# Altium PCB Zybo_Z7_Pcb.PcbDoc (part 7 of 8)
Units mm, origin at the board's own origin, x right, y up, seen from the top; angles counter-clockwise.
Board outline 122 x 88 mm, 8 copper layers (Top Layer, Layer 2, Layer 3, Layer 4, Layer 5, Layer 6, Layer 7, Bottom Layer), stack 1.625 mm thick; 658 components, 558 nets, 2538 pads, 924 vias.
Unrouted connection lines stored in the file: 1229.
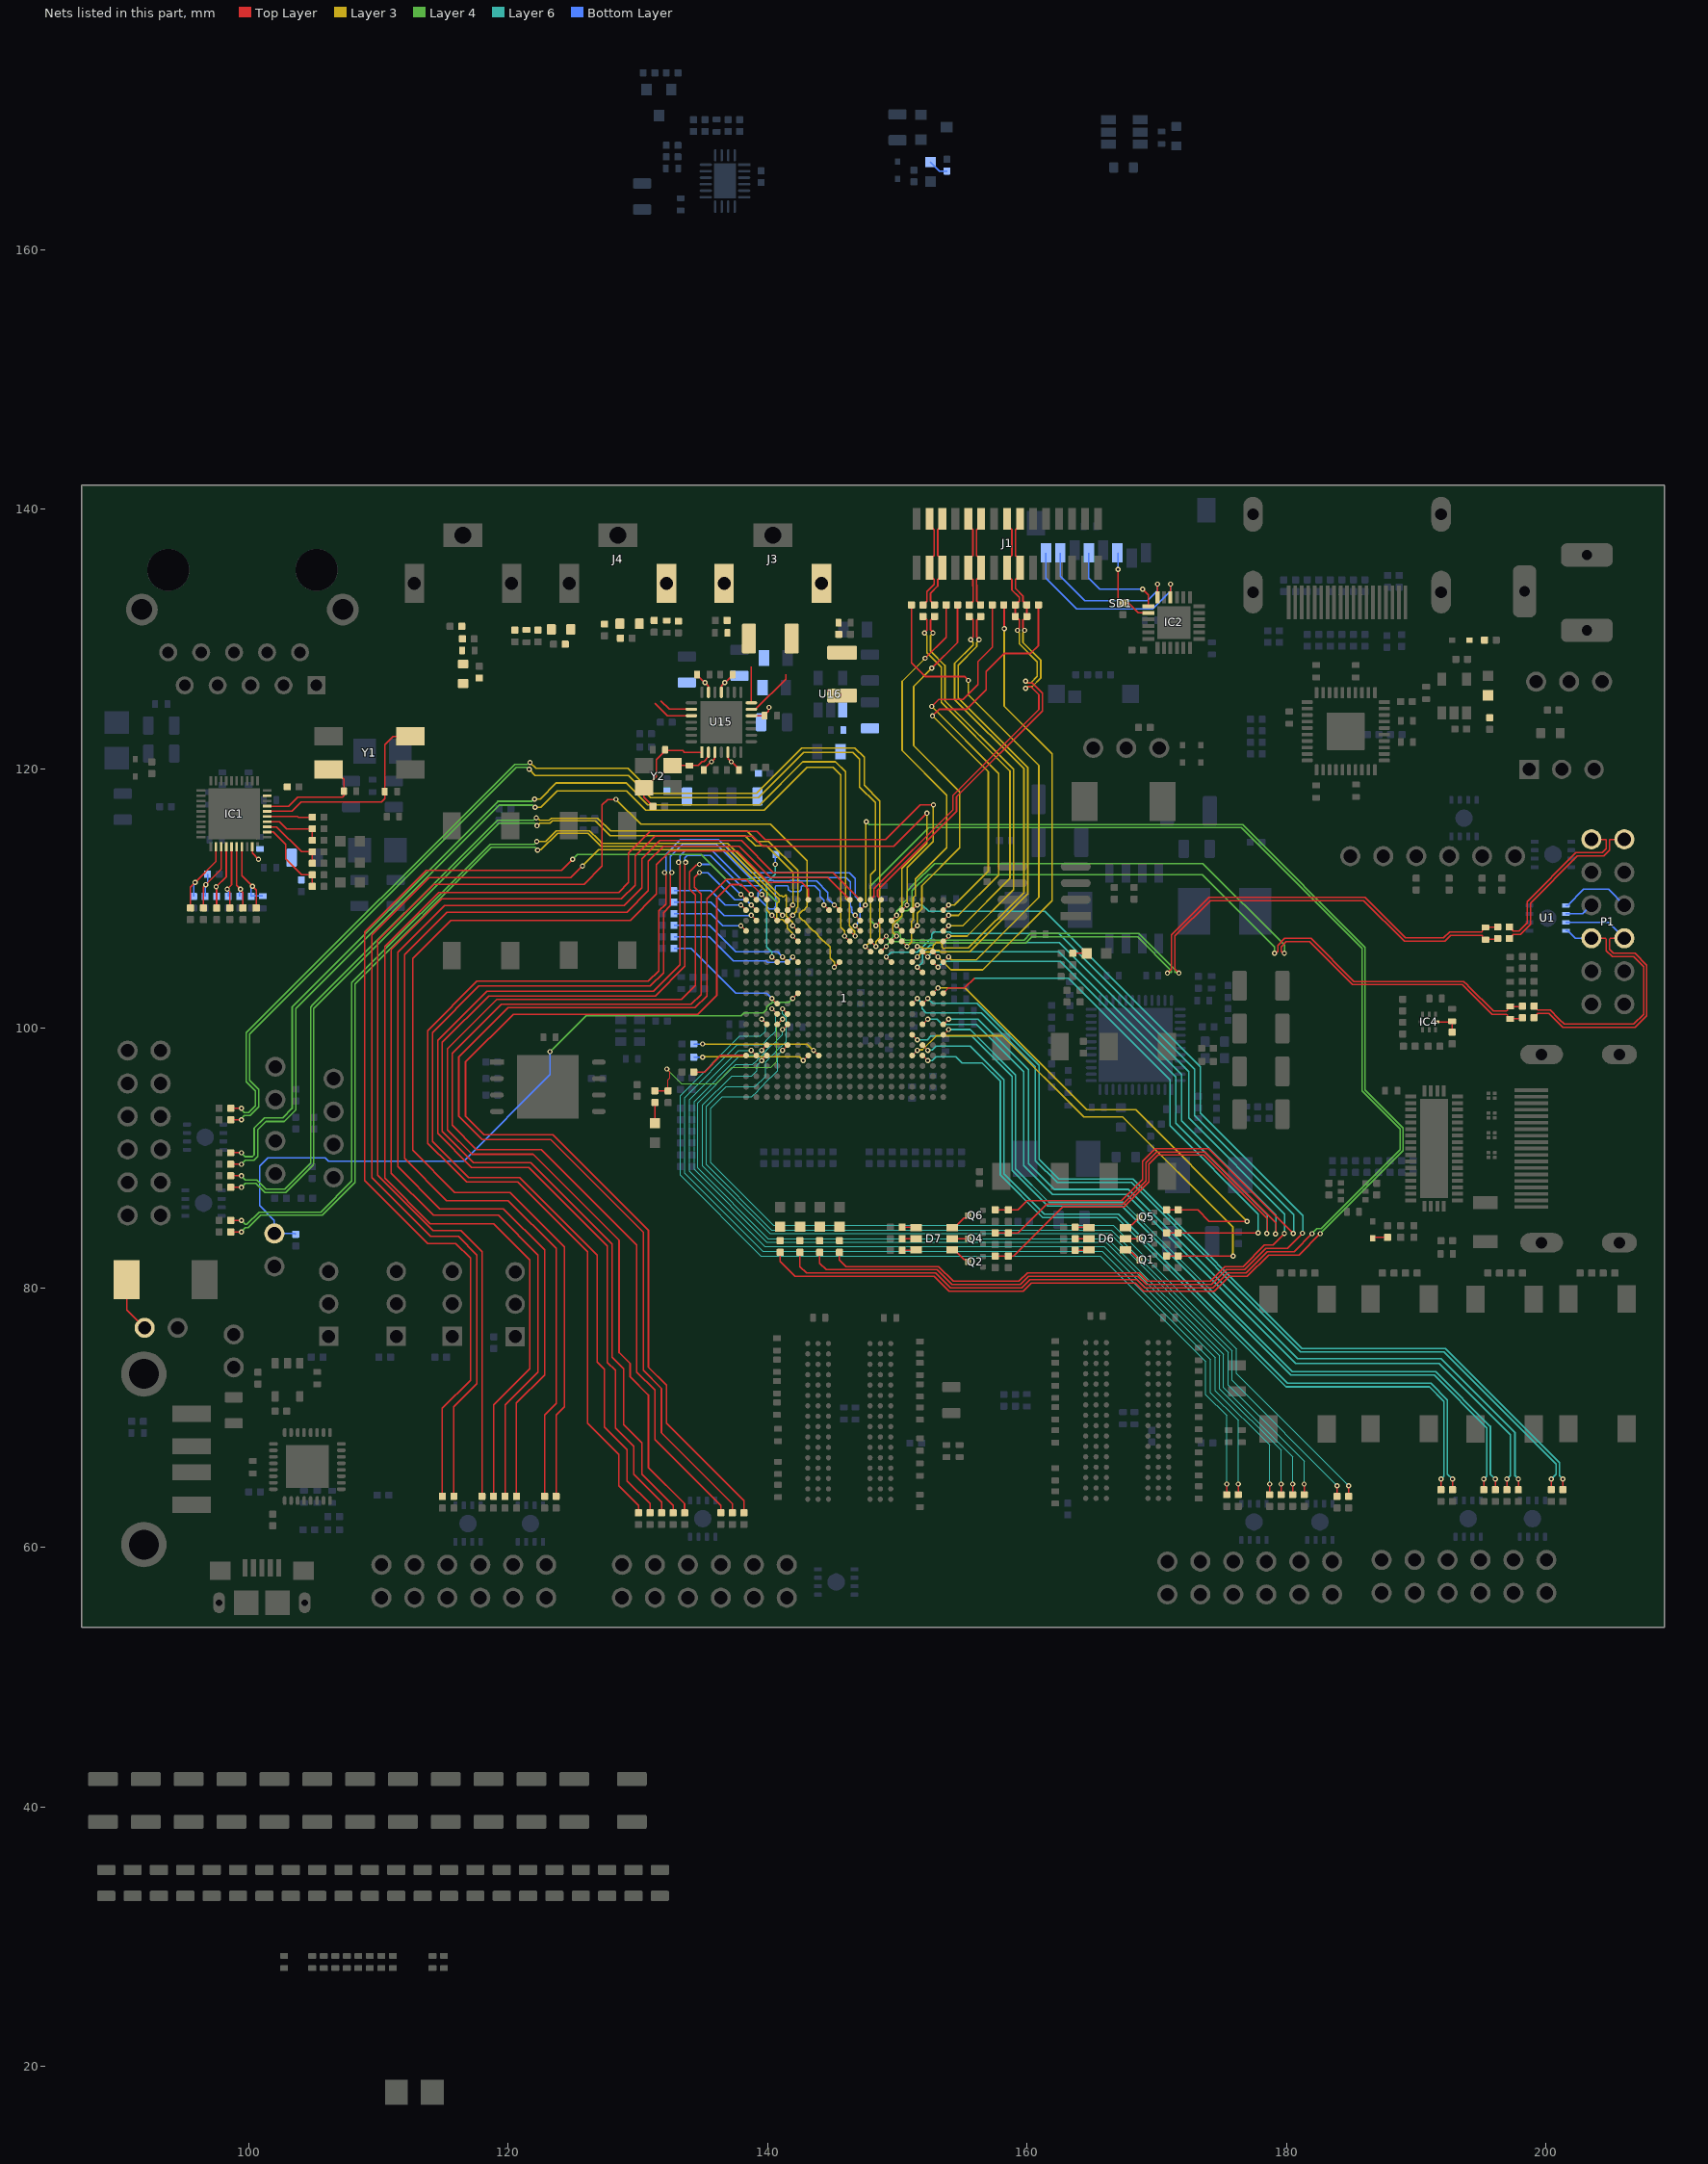
[diagram p12: the nets of this part, all layers, seen from the top]

## Via types
v1: diameter 0.4, hole 0.2, Top Layer to Bottom Layer, 249 vias
v2: diameter 0.4/0.2/0.2/0.2/0.2/0.2/0.2/0.2 (per signal layer), hole 0.2, Top Layer to Bottom Layer, 148 vias
v3: diameter 0.4/0.2/0.4/0.2/0.2/0.2/0.2/0.2 (per signal layer), hole 0.2, Top Layer to Bottom Layer, 136 vias
v4: diameter 0.4/0.2/0.2/0.4/0.2/0.2/0.2/0.2 (per signal layer), hole 0.2, Top Layer to Bottom Layer, 98 vias
v5: diameter 0.4/0.2/0.2/0.2/0.2/0.4/0.2/0.2 (per signal layer), hole 0.2, Top Layer to Bottom Layer, 68 vias
v6: diameter 0.4/0.4/0.2/0.2/0.4/0.2/0.4/0.4 (per signal layer), hole 0.2, Top Layer to Bottom Layer, 62 vias
v7: diameter 0.5, hole 0.2, Top Layer to Bottom Layer, 52 vias
v8: diameter 0.4/0.2/0.2/0.2/0.2/0.2/0.2/0.4 (per signal layer), hole 0.2, Top Layer to Bottom Layer, 31 vias
v9: diameter 0.5, hole 0.3, Top Layer to Bottom Layer, 25 vias
v10: diameter 0.4/0.4/0.2/0.2/0.4/0.4/0.4/0.4 (per signal layer), hole 0.2, Top Layer to Bottom Layer, 20 vias
v11: diameter 0.2/0.2/0.2/0.4/0.2/0.2/0.2/0.4 (per signal layer), hole 0.2, Top Layer to Bottom Layer, 15 vias
v12: diameter 0.2/0.2/0.2/0.2/0.2/0.4/0.2/0.4 (per signal layer), hole 0.2, Top Layer to Bottom Layer, 11 vias
v13: diameter 0.4/0.4/0.4/0.4/0.4/0.4/0.4/0.4 (per signal layer), hole 0.2, Top Layer to Bottom Layer, 5 vias
v14: diameter 0.4/0.2/0.2/0.2/0.2/0.4/0.2/0.4 (per signal layer), hole 0.2, Top Layer to Bottom Layer, 2 vias
v15: diameter 0.2/0.4/0.4/0.4/0.4/0.4/0.4/0.4 (per signal layer), hole 0.2, Top Layer to Bottom Layer, 2 vias

## Nets (pads, with @x,y where several pads share a name; then routed paths per layer and width w, separated by ;. In a path a pad name is that pad's centre, name@x,y a point inside that pad or via, vN(x,y) a via of type N, cw(c..) or ccw(c..) an arc to the next point about the centre after c; other vN are vias at no path point) (continued)
JA3_N: P1.7 R263.1 U1.1 | length 19
  Top Layer w0.1: R263.1@197.173,106.934 197.386,107.147 197.386,107.183 197.457,107.254 198.031,107.254 198.805,108.027 198.805,109.678 202.415,113.288 204.447,113.288 204.89,113.731 204.89,114.513 204.948,114.571 P1.7@206.035,114.571
  Bottom Layer w0.1: U1.1@201.524,109.479 201.669,109.479 202.909,110.719 204.808,110.719 206.035,109.491
JA3_P: P1.1 R265.1 U1.2 | length 15.3
  Top Layer w0.1: R265.1@197.173,107.823 197.386,107.61 197.386,107.574 197.457,107.504 197.928,107.504 198.555,108.131 198.555,109.782 202.311,113.538 204.343,113.538 204.64,113.835 204.64,114.513 204.581,114.571 P1.1@203.495,114.571
  Bottom Layer w0.1: U1.2@201.524,108.829 202.832,108.829 203.495,109.491
JA3_R_N: 1.P16 C84.2 R263.2 | length 56.4
  Top Layer w0.05: 1.P16@148.742,106.718 v4(149.142,107.118)
  Top Layer w0.1: v1(171.704,104.267) 171.384,104.587 171.384,107.122 174.121,109.859 185.951,109.859 189.077,106.734 192.205,106.734 192.661,107.19 195.055,107.19 195.113,107.131 195.113,107.015 195.288,106.84 C84.2@195.326,106.84 195.354,106.868 196.207,106.868 R263.2@196.273,106.934
  Layer 4 w0.1: v4(149.142,107.118) 149.142,107.045 149.344,106.843 149.427,106.843 149.539,106.955 149.583,106.955 149.642,107.014 149.642,107.242 149.818,107.418 150.066,107.418 150.242,107.242 150.242,106.989 150.301,106.93 150.506,106.93 150.618,106.818 152.466,106.818 153.818,106.818 159.779,106.818 160.272,107.311 168.62,107.311 171.384,104.546 171.384,104.36 171.443,104.301 171.67,104.301 v1(171.704,104.267)
JA3_R_P: 1.P15 C84.1 R265.2 | length 55.7
  Top Layer w0.05: 1.P15@148.742,105.918 v4(149.142,106.318)
  Top Layer w0.1: v1(170.815,104.267) 171.134,104.586 171.134,107.226 174.017,110.109 186.055,110.109 189.18,106.984 192.101,106.984 192.557,107.44 195.055,107.44 195.113,107.499 195.113,107.615 195.288,107.79 C84.1@195.326,107.79 196.24,107.79 R265.2@196.273,107.823
  Layer 4 w0.1: v4(149.142,106.318) 149.142,106.391 149.344,106.593 149.531,106.593 149.643,106.705 150.172,106.705 150.197,106.68 150.402,106.68 150.464,106.618 151.666,106.618 151.716,106.568 152.57,106.568 152.968,106.568 153.018,106.618 153.266,106.618 153.316,106.568 153.714,106.568 159.882,106.568 160.375,107.061 168.516,107.061 171.134,104.442 171.134,104.36 171.076,104.301 170.849,104.301 v1(170.815,104.267)
JA4_N: P1.10 R264.1 U1.3 | length 23.9
  Top Layer w0.1: R264.1@199.078,100.838 199.291,101.051 199.291,101.087 199.362,101.158 200.214,101.158 201.291,100.08 201.672,100.08 206.86,100.08 207.768,100.988 207.768,104.879 206.856,105.791 205.205,105.791 204.89,106.106 204.89,106.893 204.948,106.951 P1.10@206.035,106.951
  Bottom Layer w0.1: U1.3@201.524,108.179 204.808,108.179 P1.10@206.035,106.951
JA4_P: P1.4 R266.1 U1.4 | length 20.7
  Top Layer w0.1: R266.1@199.078,101.727 199.291,101.514 199.291,101.478 199.362,101.408 200.317,101.408 200.964,100.761 201.052,100.672 201.395,100.33 206.756,100.33 207.518,101.092 207.518,104.775 206.752,105.541 205.101,105.541 204.64,106.002 204.64,106.893 204.581,106.951 P1.4@203.495,106.951
  Bottom Layer w0.1: U1.4@201.524,107.529 201.669,107.529 202.246,106.951 P1.4@203.495,106.951
JA4_R_N: 1.R18 C85.2 R264.2 | length 58
  Top Layer w0.05: 1.R18@149.542,108.318 v4(149.942,108.718)
  Top Layer w0.1: v1(179.832,105.791) 179.751,105.791 179.576,105.966 179.576,106.299 179.961,106.684 181.779,106.684 185.085,103.378 193.55,103.378 195.834,101.094 196.96,101.094 197.018,101.035 197.018,100.919 197.193,100.744 C85.2@197.231,100.744 197.259,100.772 198.112,100.772 R264.2@198.178,100.838
  Layer 4 w0.1: v4@149.935,108.718 149.935,109.041 150.435,109.541 150.435,109.642 150.749,109.956 150.749,110.59 151.257,111.097 152.859,112.7 173.558,112.7 179.832,106.426 v1(179.832,105.791)
JA4_R_P: 1.T17 C85.1 R266.2 | length 57.6
  Top Layer w0.05: v4(149.942,107.918) 1.T17@150.342,107.518
  Top Layer w0.1: v1(179.07,105.791) 179.151,105.791 179.326,105.966 179.326,106.403 179.857,106.934 181.883,106.934 185.189,103.628 193.654,103.628 193.942,103.339 194.031,103.251 195.938,101.344 196.96,101.344 197.018,101.403 197.018,101.519 197.193,101.694 C85.1@197.231,101.694 198.145,101.694 R266.2@198.178,101.727
  Layer 4 w0.1: v4@149.942,107.911 149.966,107.935 149.966,108.183 150.335,108.552 150.335,108.933 150.463,109.061 150.812,109.061 151.13,109.379 151.13,110.617 152.375,111.862 173.507,111.862 179.07,106.299 v1(179.07,105.791)
JB1_N: 1.V8 R3.1 | length 67.3
  Top Layer w0.05: 1.V8@151.942,100.318 v5(152.342,100.718)
  Top Layer w0.1: R3.1@196.977,64.458 v1(196.977,65.278)
  Layer 6 w0.1: v5@152.335,100.718 153.059,100.718 153.447,100.33 153.758,100.33 153.77,100.318 156.095,100.318 159.742,96.671 159.742,89.432 161.949,87.225 167.664,87.225 180.703,74.186 191.752,74.186 197.242,68.696 197.242,65.543 v1(196.977,65.278)
JB1_P: 1.Y8 R4.2 | length 66.2
  Top Layer w0.05: 1.Y8@153.542,100.318 v5(153.942,100.718)
  Top Layer w0.1: R4.2@197.866,64.458 v1(197.866,65.278)
  Layer 6 w0.131: v5@153.935,100.718 156.218,100.718 160.111,96.824 160.111,89.585 162.102,87.594 167.817,87.594 180.856,74.556 191.905,74.556 197.612,68.849 197.612,65.532 v1(197.866,65.278)
JB2_N: 1.U7 R5.1 | length 66.2
  Top Layer w0.05: 1.U7@151.142,99.518 v5(151.542,99.118)
  Top Layer w0.1: R5.1@195.199,64.458 v1(195.199,65.278)
  Layer 6 w0.1: v5@151.542,99.125 152.3,99.125 152.59,99.414 153.014,99.414 153.018,99.418 153.266,99.418 153.27,99.414 155.729,99.414 158.844,96.299 158.844,89.06 161.577,86.327 167.292,86.327 180.331,73.288 191.38,73.288 195.438,69.23 195.438,65.517 v1(195.199,65.278)
JB2_P: 1.V5 R7.1 | length 62.6
  Top Layer w0.05: 1.V5@151.942,97.918 v5(152.342,97.518)
  Top Layer w0.1: R7.1@191.897,64.458 v1(191.897,65.278)
  Layer 6 w0.1: v5(152.342,97.518) 152.695,97.518 152.995,97.818 154.525,97.818 154.997,97.345 156.527,97.345
  Layer 6 w0.131: 156.527,97.345 157.946,95.927 157.946,88.688 161.205,85.429 166.92,85.429 179.959,72.39 191.008,72.39 192.136,71.262 192.136,65.517 v1(191.897,65.278)
JB3_N: 1.Y7 R6.2 | length 64.3
  Top Layer w0.05: 1.Y7@153.542,99.518 v5(153.942,99.918)
  Top Layer w0.1: R6.2@196.088,64.458 v1(196.088,65.278)
  Layer 6 w0.131: v5@153.935,99.918 155.606,99.918 159.113,96.411 159.113,89.172 161.689,86.596 167.404,86.596 180.443,73.557 191.492,73.557 195.707,69.342 195.707,65.659 v1(196.088,65.278)
JB3_P: 1.U10 R1.1 | length 71.3
  Top Layer w0.05: 1.U10@151.142,101.918 v5(151.542,102.318)
  Top Layer w0.1: R1.1@200.406,64.458 v1(200.406,65.278)
  Layer 6 w0.1: v5@151.535,102.318 151.907,101.946 151.907,101.533 152.223,101.217 156.466,101.217 160.64,97.043 160.64,89.804 162.321,88.123 168.036,88.123 181.075,75.084 192.124,75.084 200.772,66.436 200.772,65.644 v1(200.406,65.278)
JB4_N: 1.V6 R8.2 | length 63.4
  Top Layer w0.05: 1.V6@151.942,98.718 v5(152.342,98.318)
  Top Layer w0.1: R8.2@192.786,64.458 v1(192.786,65.278)
  Layer 6 w0.1: v5@152.342,98.325 152.696,98.325 152.993,98.622 155.632,98.622 158.215,96.039 158.215,88.8 161.317,85.698 167.032,85.698 180.071,72.659 191.12,72.659 192.405,71.374 192.405,65.659 v1(192.786,65.278)
JB4_P: 1.V10 R2.2 | length 70.5
  Top Layer w0.05: 1.V10@151.942,101.918 v5(152.342,102.318)
  Top Layer w0.1: R2.2@201.295,64.458 v1(201.295,65.278)
  Layer 6 w0.1: v5@152.335,102.318 152.723,101.93 156.134,101.93 160.909,97.155 160.909,89.916 162.433,88.392 168.148,88.392 181.187,75.353 192.236,75.353 201.041,66.548 201.041,65.532 v1(201.295,65.278)
JC1_N: 1.J19 R17.1 | length 93.2
  Top Layer w0.05: v2(144.342,109.518) 1.J19@144.742,109.118
  Top Layer w0.1: R17.1@132.715,62.68 132.715,63.246 130.302,65.659 130.302,68.072 128.905,69.469 128.905,73.787 128.016,74.676 128.016,83.375 121.729,89.662 117.341,89.662 114.934,92.069 114.934,98.939 118.511,102.516 131.338,102.516 133.604,104.782 133.604,112.725 v1(133.68,112.801)
  Bottom Layer w0.1: v1(133.68,112.801) 133.608,112.874 133.608,113.135 133.803,113.33 135.59,113.33 137.922,110.998 139.522,110.998 139.581,110.939 139.581,110.781 139.242,110.442 139.242,110.079 140.103,109.218 140.466,109.218 140.642,109.394 140.642,110.136 140.581,110.197 140.581,110.939 140.64,110.998 141.554,110.998 141.613,110.939 141.613,110.69 141.763,110.54 142.463,110.54 142.613,110.69 142.613,110.939 142.672,110.998 143.637,110.998 144.035,110.6 144.035,110.194 144.342,109.887 v2@144.342,109.511
JC1_P: 1.K19 R18.2 | length 90.3
  Top Layer w0.05: v2(145.142,109.518) 1.K19@145.542,109.118
  Top Layer w0.1: R18.2@131.826,62.68 131.826,63.5 129.667,65.659 129.667,67.818 128.27,69.215 128.27,73.66 127.662,74.268 127.662,83.228 121.582,89.308 117.194,89.308 114.58,91.922 114.58,99.086 118.364,102.87 131.191,102.87 133.25,104.929 133.25,112.698 v1(133.147,112.801)
  Bottom Layer w0.1: v1(133.147,112.801) 133.248,112.903 133.248,113.284 133.654,113.69 135.738,113.69 138.071,111.357 139.698,111.357 139.731,111.39 140.431,111.39 140.464,111.357 141.73,111.357 141.763,111.39 142.463,111.39 142.496,111.357 143.786,111.357 144.653,110.49 144.653,110 v2@145.142,109.511
JC2_N: 1.B20 R9.1 | length 79.7
  Top Layer w0.05: v2(138.742,110.318) 1.B20@139.142,109.918
  Top Layer w0.131: R9.1@138.176,62.68 138.176,63.627 132.207,69.596 132.207,72.517 130.81,73.914 130.81,84.455 123.444,91.821 118.148,91.821 116.713,93.256 116.713,97.409 120.396,101.092 134.62,101.092 136.079,102.551 136.079,110.044 137.128,111.093 137.96,111.093 v2@138.739,110.315
JC2_P: 1.C20 R10.2 | length 81.4
  Top Layer w0.05: v2(139.542,110.318) 1.C20@139.942,109.918
  Top Layer w0.131: R10.2@137.287,62.68 137.287,63.373 131.822,68.838 131.822,72.267 130.425,73.664 130.425,84.296 123.285,91.436 117.989,91.436 116.205,93.22 116.205,97.811 119.994,101.6 134.41,101.6 135.321,102.511 135.321,110.004 136.795,111.478 138.375,111.478 v2@139.539,110.315
JC3_N: 1.M18 R21.1 | length 94
  Top Layer w0.05: v2(146.742,108.718) 1.M18@147.142,108.318
  Top Layer w0.1: R21.1@130.937,62.68 130.937,63.373 129.159,65.151 129.159,67.564 127.436,69.287 127.436,73.732 126.873,74.295 126.873,82.55 120.904,88.519 116.944,88.519 114.157,91.306 114.157,99.686 117.749,103.278 130.957,103.278 131.977,104.298 131.977,108.921 132.512,109.456 132.512,111.912 v1(132.613,112.014)
  Bottom Layer w0.1: v1(132.613,112.014) 132.51,112.117 132.51,113.264 133.442,114.196 136.07,114.196 138.633,111.633 146.05,111.633 146.395,111.288 146.395,109.435 146.494,109.335 146.494,108.959 v2@146.742,108.711
JC3_P: 1.M17 R22.2 | length 96
  Top Layer w0.05: v2(146.742,107.918) 1.M17@147.142,107.518
  Top Layer w0.1: R22.2@130.048,62.68 130.048,63.246 128.524,64.77 128.524,67.183 126.111,69.596 126.111,82.811 120.757,88.165 116.797,88.165 115.578,89.384 113.803,91.159 113.803,99.833 117.602,103.632 130.81,103.632 131.623,104.445 131.623,109.068 132.158,109.603 132.158,111.911 v1(132.055,112.014)
  Bottom Layer w0.1: v1(132.055,112.014) 132.156,112.116 132.156,113.411 133.295,114.55 135.862,114.55 136.217,114.55 138.779,111.987 146.304,111.987 146.749,111.542 146.749,110.172 147.142,109.779 147.142,108.311 v2@146.742,107.911
JC4_N: 1.A20 R14.2 | length 81.9
  Top Layer w0.05: v2(137.942,110.318) 1.A20@138.342,109.918
  Top Layer w0.131: R14.2@133.604,62.68 133.604,63.373 130.81,66.167 130.81,71.755 129.413,73.152 129.413,74.168 128.559,75.022 128.559,83.669 121.919,90.308 117.217,90.308 115.327,92.198 115.327,98.436 119.126,102.235 133.35,102.235 134.427,103.312 134.427,110.302 133.99,110.739 133.99,112.08 134.508,112.598 134.696,112.598 v1(134.747,112.649)
  Bottom Layer w0.131: v1(134.747,112.649) 135.611,112.649 137.935,110.325 v2@137.935,110.318
JC4_P: 1.B19 R13.1 | length 83.3
  Top Layer w0.05: v2(138.742,109.518) 1.B19@139.142,109.118
  Top Layer w0.1: v1(134.747,112.014) 134.36,111.627 134.36,110.892 134.874,110.378 134.874,102.616 134.111,101.853 119.477,101.853 115.697,98.072 115.697,92.55 117.569,90.678 122.555,90.678 129.921,83.312 129.921,73.533 131.318,72.136 131.318,68.326 136.398,63.246 R13.1@136.398,62.68
  Bottom Layer w0.1: v1(134.747,112.014) 135.382,112.014 137.485,109.911 138.342,109.911 v2@138.742,109.511
JD1_N: 1.E19 R16.2 | length 67.6
  Top Layer w0.05: 1.E19@141.542,109.118 v3(141.942,109.518)
  Top Layer w0.1: R16.2@98.621,87.757 v1(99.441,87.757)
  Layer 4 w0.1: v1(99.441,87.757) 99.761,88.077 100.546,88.077 101.246,87.376 102.87,87.376 104.956,89.462 105.029,89.535 105.029,101.551 119.278,115.801 120.593,115.801 122.027,115.801 122.207,115.621 v1(122.235,115.621)
  Layer 3 w0.1: v1(122.235,115.621) 122.442,115.827 123.24,115.827 123.42,116.007 126.715,116.007 127.862,114.86 138.258,114.86 139.054,114.065 139.935,114.065 141.981,112.019 141.981,109.564 v3@141.935,109.518
JD1_P: 1.E18 R15.1 | length 69
  Top Layer w0.05: 1.E18@141.542,108.318 v3(141.942,108.718)
  Top Layer w0.1: R15.1@98.621,88.646 v1(99.441,88.646)
  Layer 4 w0.1: v1(99.441,88.646) 99.76,88.327 100.649,88.327 100.723,88.253 101.35,87.626 102.766,87.626 104.779,89.639 104.779,101.655 104.946,101.822 119.175,116.051 120.49,116.051 121.965,116.051 122.145,116.23 v1(122.174,116.23)
  Layer 3 w0.1: v1(122.174,116.23) 122.255,116.23 122.458,116.027 123.157,116.027 123.337,116.207 126.896,116.207 127.889,115.214 138.405,115.214 139.2,114.419 140.082,114.419 142.335,112.165 142.335,109.352 142.24,109.257 142.24,109.023 v3@141.935,108.718
JD2_N: 1.F17 R11.1 | length 69.8
  Top Layer w0.05: v3(141.942,107.918) 1.F17@142.342,107.518
  Top Layer w0.1: R11.1@98.621,85.217 v1(99.441,85.217)
  Layer 4 w0.1: v1(99.441,85.217) 99.761,84.897 99.862,84.897 100.817,85.852 105.564,85.852 107.954,88.242 107.954,103.534 118.616,114.196 122.004,114.196 v1(122.211,114.402) v1(122.211,114.402)
  Layer 3 w0.1: v1(122.211,114.402) 122.885,114.402 123.723,115.24 126.289,115.24 126.96,114.568 127.252,114.277 136.919,114.277 140.98,110.216 141.063,110.216 141.098,110.251 141.098,110.202 141.156,110.144 141.239,110.144 141.393,110.297 141.451,110.297 141.451,110.002 141.442,109.993 141.442,108.646 141.77,108.318 141.774,108.318 141.93,108.162 v3@141.93,107.949
JD2_P: 1.F16 R12.2 | length 70.4
  Top Layer w0.05: v3(141.942,107.118) 1.F16@142.342,106.718
  Top Layer w0.1: R12.2@98.621,84.328 v1(99.441,84.328)
  Layer 4 w0.1: v1(99.441,84.328) 99.761,84.647 99.966,84.647 100.921,85.602 105.668,85.602 105.741,85.675 108.204,88.138 108.204,103.431 118.72,113.946 122.069,113.946 122.274,113.741 v1(122.276,113.741)
  Layer 3 w0.1: v1(122.276,113.741) 122.307,113.773 122.539,113.773 123.806,115.04 126.143,115.04 127.151,114.032 127.156,114.027 136.816,114.027 140.873,109.969 140.873,109.778 140.709,109.613 140.709,108.547 140.854,108.402 141.153,108.402 141.53,108.025 141.53,107.741 141.945,107.326 v3@141.945,107.111
JD3_N: 1.L17 R19.1 | length 81.1
  Top Layer w0.05: 1.L17@146.342,107.518 v3(146.742,107.118)
  Top Layer w0.1: R19.1@98.621,90.424 v1(99.441,90.424)
  Layer 4 w0.131: v1(99.441,90.424) 99.745,90.12 100.28,90.12 100.43,90.27 100.43,92.318 101.23,93.118 102.627,93.118 103.351,93.842 103.351,101.64 119.212,117.501 121.825,117.501 122.002,117.678 v1(122.036,117.678)
  Layer 3 w0.131: v1(122.036,117.678) 122.479,117.678 123.723,118.923 129.078,118.923 130.767,117.234 139.408,117.234 142.723,120.548 145.237,120.548 146.011,119.775 146.011,110.021 146.304,109.728 146.304,107.903 146.691,107.517 146.691,107.176 v3@146.742,107.125
JD3_P: 1.L16 R20.2 | length 80.2
  Top Layer w0.05: v3(145.942,107.118) 1.L16@146.342,106.718
  Top Layer w0.1: R20.2@98.621,89.535 v1(99.441,89.535)
  Layer 4 w0.131: v1(99.441,89.535) 99.745,89.839 100.396,89.839 100.711,90.154 100.711,92.202 101.346,92.837 102.743,92.837 103.632,93.726 103.632,101.524 119.328,117.22 121.861,117.22 122.038,117.043 v1(122.072,117.043)
  Layer 3 w0.1: v1(122.072,117.043) 122.53,117.043 123.774,118.288 129.132,118.288 130.597,116.823 139.727,116.823 143.041,120.137 145.039,120.137 145.641,119.535 145.641,107.801 145.942,107.5 v3@145.942,107.111
JD4_N: 1.N16 R23.1 | length 82.9
  Top Layer w0.05: 1.N16@147.942,106.718 v3(148.342,106.318)
  Top Layer w0.1: R23.1@98.621,93.853 v1(99.441,93.853)
  Layer 4 w0.1: v1(99.441,93.853) 99.441,93.772 99.679,93.533 100.01,93.533 100.534,94.057 100.534,95.2 99.826,95.908 99.826,99.672 120.51,120.356 121.478,120.356 121.619,120.498 v1(121.686,120.498)
  Layer 3 w0.1: v1(121.686,120.498) 122.144,120.04 129.235,120.04 131.14,118.135 139.157,118.135 142.637,121.615 146.71,121.615 147.441,120.885 147.441,118.751 148.649,117.543 148.649,107.003 148.339,106.693 v3@148.339,106.325
JD4_P: 1.N15 R24.2 | length 82.5
  Top Layer w0.05: v3(147.542,106.318) 1.N15@147.942,105.918
  Top Layer w0.1: R24.2@98.621,92.964 v1(99.441,92.964)
  Layer 4 w0.1: v1(99.441,92.964) 99.441,93.045 99.679,93.283 100.114,93.283 100.784,93.954 100.784,95.304 100.711,95.377 100.076,96.012 100.076,99.568 120.614,120.106 121.412,120.106 121.554,119.964 v1(121.621,119.964)
  Layer 3 w0.1: v1(121.621,119.964) 122.078,119.507 129.268,119.507 130.994,117.781 139.304,117.781 142.784,121.261 146.564,121.261 147.087,120.738 147.087,118.604 148.295,117.397 148.295,112.227 147.935,111.867 147.935,108.084 147.942,108.077 147.942,107.746 147.935,107.739 147.935,106.701 v3@147.545,106.311
JE1: 1.D19 R38.2 | length 86.5
  Top Layer w0.05: 1.D19@140.742,109.118 v4(141.142,108.718)
  Top Layer w0.1: R38.2@114.935,63.95 114.935,70.739 117.094,72.898 117.094,82.296 115.954,83.436 113.795,83.436 108.961,88.27 108.961,107.437 113.696,112.172 124.11,112.172 v1(124.968,113.03)
  Layer 4 w0.1: v1(124.968,113.03) 125.349,113.411 134.874,113.411 136.779,111.506 138.938,111.506 140.716,109.728 140.716,109.151 v4@141.142,108.725
JE2: 1.G20 R26.2 | length 86.3
  Top Layer w0.1: R26.2@123.698,63.95 123.698,70.222 124.333,70.857 124.333,83.185 120.142,87.376 115.892,87.376 112.649,90.619 112.649,105.41 115.57,108.331 129.413,108.331 131.445,110.363 131.445,112.615 132.495,113.665 137.668,113.665 140.081,111.252 142.621,111.252 143.142,110.731 1.G20@143.142,109.918
JE3: 1.T19 R34.2 | length 108.8
  Top Layer w0.05: 1.T19@150.342,109.118 v3(150.742,109.518)
  Top Layer w0.1: R34.2@118.872,63.95 118.872,70.993 121.666,73.787 121.666,82.169 118.872,84.963 114,84.963 110.487,88.476 110.487,106.305 114.675,110.493 128.518,110.493 129.283,111.258 129.283,113.51 130.962,115.189 139.192,115.189 139.827,114.554 149.098,114.554 151.765,117.221 v1(152.781,117.221)
  Layer 3 w0.1: v3@150.735,109.518 150.742,109.525 150.742,112.388 152.775,114.421 152.775,117.215 v1(152.781,117.221)
JE4: 1.R16 R29.1 | length 109.7
  Top Layer w0.05: 1.R16@149.542,106.718 v3(149.942,107.118)
  Top Layer w0.1: R29.1@119.761,63.95 119.761,70.984 122.301,73.524 122.301,82.55 119.253,85.598 114.238,85.598 110.995,88.841 110.995,106.095 114.885,109.985 128.728,109.985 129.791,111.048 129.791,113.3 131.3,114.808 138.855,114.808 139.617,114.046 149.733,114.046 v1(152.273,116.586)
  Layer 3 w0.1: v3@149.935,107.118 149.642,107.411 149.642,108.036 149.921,108.315 149.963,108.315 150.343,108.694 150.343,112.324 152.273,114.254 v1(152.273,116.586)
JE7: 1.D18 R37.1 | length 85.7
  Top Layer w0.05: v2(140.342,108.718) 1.D18@140.742,108.318
  Top Layer w0.1: R37.1@115.824,63.95 115.824,70.866 117.602,72.644 117.602,82.55 116.177,83.975 114.018,83.975 109.5,88.493 109.5,107.214 113.919,111.633 124.841,111.633 v1(125.73,112.522)
  Layer 3 w0.1: v1(125.73,112.522) 126.991,113.783 136.665,113.783 139.954,110.494 139.954,109.099 v2@140.342,108.711
JE8: 1.L20 R25.1 | length 90.5
  Top Layer w0.1: R25.1@122.809,63.95 122.809,70.231 123.698,71.12 123.698,83.058 120.015,86.741 115.257,86.741 112.014,89.984 112.014,105.673 115.307,108.966 129.15,108.966 130.81,110.626 130.81,112.878 131.978,114.046 137.795,114.046 140.208,111.633 144.627,111.633 1.L20@146.342,109.918
JE9: 1.K14 R33.1 | length 100
  Top Layer w0.05: v3(145.142,104.718) 1.K14@145.542,105.118
  Top Layer w0.1: R33.1@117.983,63.95 117.983,82.804 116.363,84.424 114.204,84.424 109.949,88.679 109.949,106.774 114.3,111.125 125.857,111.125 127.254,112.522 127.254,117.221 127.686,117.653 v1(128.321,117.653)
  Layer 3 w0.1: v1(128.321,117.653) 130.226,115.748 140.208,115.748 143.042,112.914 143.042,109.394 142.766,109.118 142.718,109.118 142.442,108.842 142.442,108.594 142.718,108.318 142.766,108.318 143.152,107.933 143.152,107.884 143.537,107.499 143.59,107.499 143.885,107.204 143.885,107.146 144.299,106.732 144.359,106.732 144.812,106.279 144.812,105.419 145.149,105.082 v3@145.149,104.718
JE10: 1.M20 R30.2 | length 92.8
  Top Layer w0.1: R30.2@120.65,63.95 120.65,71.155 122.809,73.314 122.809,82.931 119.634,86.106 114.746,86.106 111.503,89.349 111.503,105.885 115.095,109.477 128.938,109.477 130.299,110.838 130.299,113.089 131.683,114.473 138.003,114.473 140.462,112.014 145.046,112.014 1.M20@147.142,109.918
JF1: 1.E8 R31.1 | length 74.2
  Top Layer w0.05: v5(141.142,99.918) 1.E8@141.542,100.318
  Top Layer w0.1: R31.1@180.467,64.077 v1(180.467,64.897)
  Layer 6 w0.09: v5(141.142,99.918) 141.142,99.535 140.688,99.081 140.688,99.046 140.384,98.743 140.35,98.743 139.902,98.295 139.902,98.261 139.592,97.951 139.557,97.951 139.211,97.604 139.211,97.57 138.864,97.223 137.56,97.223 134.613,94.277 134.613,89.238 140.038,83.813 166.2,83.813 175.126,74.887 175.126,72.347 180.467,67.007 v1(180.467,64.897)
JF2: 1.E9 R27.1 | length 77.6
  Top Layer w0.05: v5(141.142,101.518) 1.E9@141.542,101.118
  Top Layer w0.1: R27.1@183.896,63.95 v1(183.896,64.77)
  Layer 6 w0.09: v5(141.142,101.518) 141.142,101.135 141.437,100.84 141.437,98.996 141.054,98.613 141.02,98.613 140.637,98.23 140.637,98.196 140.359,97.918 140.325,97.918 139.837,97.43 139.837,96.319 139.038,95.521 136.796,95.521 135.277,94.002 135.277,89.513 140.313,84.477 166.475,84.477 175.79,75.162 175.79,72.876 v1(183.896,64.77)
JF3: 1.C6 R36.2 | length 71.8
  Top Layer w0.05: v5(139.542,98.318) 1.C6@139.942,98.718
  Top Layer w0.1: R36.2@179.578,64.077 v1(179.578,64.897)
  Layer 6 w0.09: v5(139.542,98.318) 139.141,97.917 137.873,97.917 134.344,94.388 134.344,89.127 139.927,83.544 166.089,83.544 174.857,74.776 174.857,72.236 179.578,67.515 v1(179.578,64.897)
JF4: 1.D9 R39.1 | length 75.2
  Top Layer w0.05: v5(140.342,101.518) 1.D9@140.742,101.118
  Top Layer w0.1: R39.1@176.276,64.077 v1(176.276,64.897)
  Layer 6 w0.09: v5(140.342,101.518) 140.637,101.223 140.637,99.796 140.359,99.518 140.325,99.518 139.889,99.083 139.889,99.048 139.578,98.737 137.676,98.737 133.625,94.686 133.625,88.829 139.629,82.825 165.791,82.825 174.138,74.478 174.138,71.938 176.276,69.801 v1(176.276,64.897)
JF7: 1.E6 R28.2 | length 74.2
  Top Layer w0.05: v5(141.142,98.318) 1.E6@141.542,98.718
  Top Layer w0.1: R28.2@184.785,63.95 v1(184.785,64.77)
  Layer 6 w0.09: v5(141.142,98.318) 140.793,97.969 140.793,96.751 140.254,96.213 140.22,96.213 139.247,95.24 139.247,95.206 138.783,94.742 136.525,94.742 135.636,93.853 135.636,89.662 140.462,84.836 166.624,84.836 176.149,75.311 176.149,73.406 v1(184.785,64.77)
JF8: 1.B5 R35.1 | length 71.2
  Top Layer w0.05: v5(138.742,98.318) 1.B5@139.142,97.918
  Top Layer w0.1: R35.1@178.689,64.077 v1(178.689,64.897)
  Layer 6 w0.09: v5(138.742,98.318) 137.779,98.318 133.994,94.533 133.994,88.982 139.782,83.194 165.944,83.194 174.507,74.631 174.507,72.091 178.689,67.909 v1(178.689,64.897)
JF9: 1.C5 R32.2 | length 71.3
  Top Layer w0.05: v5(139.542,97.518) 1.C5@139.942,97.918
  Top Layer w0.1: R32.2@181.356,64.077 v1(181.356,64.897)
  Layer 6 w0.09: v5(139.542,97.518) 139.193,97.169 139.193,96.751 138.787,96.346 137.24,96.346 135.007,94.113 135.007,89.402 140.202,84.207 166.364,84.207 175.52,75.051 175.52,72.511 181.356,66.675 v1(181.356,64.897)
JF10: 1.C8 R40.2 | length 73.8
  Top Layer w0.05: v5(139.542,100.718) 1.C8@139.942,100.318
  Top Layer w0.1: R40.2@175.387,64.077 v1(175.387,64.897)
  Layer 6 w0.09: v5(139.542,100.718) 139.837,100.423 139.837,99.796 139.454,99.413 137.845,99.413 133.266,94.835 133.266,88.68 139.48,82.466 165.642,82.466 173.779,74.329 173.779,71.789 175.387,70.182 v1(175.387,64.897)
LD_MIO/VCFG0: 1.D8 R43.2 R245.2 | length 16.5
  Top Layer w0.05: 1.D8@140.742,100.318 v4(141.142,100.718)
  Top Layer w0.09: v1(132.232,96.876) 132.232,96.859 132.461,96.63 132.461,96.182 132.334,96.055 R245.2@132.334,95.192
  Top Layer w0.1: R43.2@131.31,95.202 131.315,95.197 132.329,95.197 R245.2@132.334,95.192
  Layer 4 w0.09: v1(132.232,96.876) 133.35,95.758 133.477,95.758 135.433,95.758 136.017,95.758 137.272,97.013 140.254,97.013 140.688,97.446 140.688,100.264 v4(141.142,100.718)
LED0: 1.M19 R65.2 | length 121
  Top Layer w0.05: 1.M19@147.142,109.118 v3(147.542,109.518)
  Top Layer w0.1: R65.2@140.97,82.747 140.97,82.042 142.113,80.899 152.846,80.899 153.989,79.756 159.701,79.756 160.336,80.391 168.34,80.391 168.975,79.756 174.433,79.756 175.576,80.899 176.973,80.899 178.624,82.55 180.961,82.55 v1(182.601,84.19)
  Layer 4 w0.1: v1(147.599,115.926) 147.811,115.714 176.61,115.714 186.063,106.26 186.063,95.271 188.993,92.341 188.993,90.582 v1@182.606,84.195
  Layer 3 w0.1: v3@147.535,109.518 147.561,109.544 147.561,115.887 v1(147.599,115.926)
LED1: 1.P18 R62.2 | length 117.1
  Top Layer w0.05: v4(148.342,107.918) 1.P18@148.742,108.318
  Top Layer w0.1: R62.2@142.494,82.747 142.494,81.661 143.002,81.153 152.952,81.153 154.095,80.01 159.595,80.01 160.23,80.645 168.446,80.645 169.081,80.01 174.327,80.01 175.47,81.153 176.867,81.153 178.518,82.804 180.58,82.804 v1(181.966,84.19)
  Layer 4 w0.1: v4@148.347,107.916 148.349,107.918 147.935,108.331 147.935,110.978 152.434,115.477 176.512,115.477 185.826,106.162 185.826,95.173 188.756,92.243 188.756,90.681 182.652,84.577 182.353,84.577 v1(181.966,84.19)
LED2: 1.U19 R61.2 | length 84.5
  Top Layer w0.05: 1.U19@151.142,109.118 v5(151.542,109.518)
  Top Layer w0.1: R61.2@144.018,82.747 144.018,81.915 144.526,81.407 153.057,81.407 154.2,80.264 159.49,80.264 160.125,80.899 168.551,80.899 169.186,80.264 174.222,80.264 175.365,81.407 176.762,81.407 178.413,83.058 180.064,83.058 v1(181.229,84.223)
  Layer 6 w0.1: v5@151.535,109.518 151.922,109.518 152.416,109.025 161.358,109.025 173.355,97.028 173.355,93.472 181.254,85.573 181.254,84.249 v1(181.229,84.223)
LED3: 1.V13 R58.2 | length 80
  Top Layer w0.05: v5(151.542,104.718) 1.V13@151.942,104.318
  Top Layer w0.1: R58.2@145.542,82.747 145.542,82.169 146.05,81.661 153.162,81.661 154.305,80.518 159.385,80.518 160.02,81.153 168.656,81.153 169.291,80.518 174.117,80.518 175.26,81.661 176.657,81.661 178.308,83.312 178.943,83.312 v1(179.832,84.201)
  Layer 6 w0.1: v5@151.549,104.711 151.942,105.105 151.942,105.841 152.527,106.426 152.798,106.426 152.994,106.622 162.491,106.622 172.457,96.656 172.457,93.1 179.857,85.7 179.857,84.226 v1(179.832,84.201)
LED5_B: 1.U5 R74.2 R85.2 | length 38.8
  Top Layer w0.05: 1.U5@151.142,97.918 v3(151.542,98.318)
  Top Layer w0.1: R74.2@170.748,82.473 R85.2@171.637,82.473 v1(175.87,82.474)
  Layer 3 w0.131: v3@151.535,98.318 151.578,98.361 151.932,98.361 153.012,99.441 158.115,99.441 164.369,93.187 167.366,93.187 175.87,84.684 v1(175.87,82.474)
LED5_G: 1.Y11 R79.2 R84.2 | length 42.9
  Top Layer w0.1: 153.935,103.115 155.185,103.115 155.956,103.886 ; R79.2@170.748,84.251 R84.2@171.637,84.251 171.645,84.243 v1(177.8,84.243)
  Top Layer w0.131: 1.Y11@153.542,102.721 153.935,103.115
  Layer 6 w0.1: 155.956,103.886 163.195,103.886 171.02,96.061 171.02,92.505 177.825,85.7 177.825,84.269 v1(177.8,84.243)
LED5_R: 1.W11 R81.2 R83.2 | length 38.4
  Top Layer w0.05: 1.W11@152.742,102.718 v3(153.142,103.118)
  Top Layer w0.1: R81.2@170.748,86.029 R83.2@171.637,86.029 173.153,86.029 174.041,85.141 v1(176.962,85.141)
  Layer 3 w0.1: v3@153.135,103.118 155.2,103.118 164.592,93.726 168.377,93.726 v1(176.962,85.141)
LED6_B: 1.W14 R76.2 R88.2 | length 65.9
  Top Layer w0.05: 1.W14@152.742,105.118 v5(153.142,104.718)
  Top Layer w0.1: R76.2@157.54,82.473 R88.2@158.556,82.473 158.978,82.473 162.746,86.242 167.471,86.242 169.393,88.163 169.393,89.56 170.078,90.246 173.629,90.246 178.511,85.364 178.511,84.241 v1(178.486,84.215)
  Layer 6 w0.1: v5@153.142,104.725 153.573,105.156 162.56,105.156 171.469,96.247 171.469,92.691 178.511,85.649 178.511,84.241 v1(178.486,84.215)
LED6_G: 1.V15 R80.2 R87.2 | length 67.7
  Top Layer w0.05: 1.V15@151.942,105.918 v5(152.342,105.518)
  Top Layer w0.1: R80.2@157.54,84.251 R87.2@158.556,84.251 159.283,84.251 161.51,86.479 167.373,86.479 169.156,88.262 169.156,89.659 169.98,90.483 173.728,90.483 179.172,85.039 179.172,84.203 v1(179.146,84.177)
  Layer 6 w0.1: v5@152.342,105.525 152.735,105.918 162.433,105.918 171.918,96.433 171.918,92.877 179.172,85.623 179.172,84.203 v1(179.146,84.177)
LED6_R: 1.R14 R82.2 R86.2 | length 73.9
  Top Layer w0.05: v5(149.142,105.518) 1.R14@149.542,105.118
  Top Layer w0.1: R82.2@157.54,86.029 R86.2@158.556,86.029 159.308,86.029 159.995,86.716 167.274,86.716 168.919,88.36 168.919,89.757 169.882,90.72 174.002,90.72 v1(180.518,84.205)
  Layer 6 w0.1: v5@149.142,105.511 149.523,105.893 151.541,105.893 152.642,106.994 152.642,107.252 152.808,107.418 154.06,107.418 154.163,107.315 162.433,107.315 172.906,96.842 172.906,93.286 180.543,85.649 180.543,84.23 v1(180.518,84.205)
LP_CLK_N: 1.W15 R54.1 | length 36.3
  Top Layer w0.05: 1.W15@152.742,105.918 v3(153.142,105.518)
  Top Layer w0.131: R54.1@158.198,132.639 158.242,132.595 v1(158.242,130.81)
  Layer 3 w0.124: v3(153.142,105.518) 154.139,104.521 156.591,104.521 161.925,109.855 161.925,121.158 158.242,124.841 v1(158.242,130.81)
LP_CLK_P: 1.Y19 R48.1 | length 32.8
  Top Layer w0.05: 1.Y19@153.542,109.118 v3(153.942,109.518)
  Top Layer w0.131: v1(152.705,124.079) 153.213,124.587 155.321,124.587 156.845,126.111 156.845,127.508 158.242,128.905 160.274,128.905 160.876,129.507 R48.1@160.876,132.639
  Layer 3 w0.131: v1(152.705,124.079) 157.017,119.767 157.017,112.151 154.384,109.518 v3@153.935,109.518
LP_LANE0_N: 1.Y14 R52.1 | length 38
  Top Layer w0.05: 1.Y14@153.542,105.118 v3(153.942,105.518)
  Top Layer w0.131: R52.1@151.086,132.639 151.086,128.187 152.146,127.127 155.169,127.127 v1(155.473,126.822)
  Layer 3 w0.131: v3(153.942,105.518) 154.177,105.283 156.083,105.283 160.909,110.109 160.909,120.269 155.473,125.705 v1(155.473,126.822)
LP_LANE0_P: 1.T16 R46.1 | length 31
  Top Layer w0.05: 1.T16@150.342,106.718 v3(150.742,106.318)
  Top Layer w0.131: v1(152.146,128.524) 153.764,130.142 R46.1@153.764,132.639
  Layer 3 w0.124: v3(150.742,106.318) 151.09,106.666 151.09,108.238 151.23,108.378 151.23,110.082 151.384,110.236 151.384,111.506 153.797,113.919 153.797,117.983 150.368,121.412 150.368,126.746 v1(152.146,128.524)
LP_LANE1_N: 1.U17 R53.1 | length 29.5
  Top Layer w0.05: 1.U17@151.142,107.518 v3(151.542,107.918)
  Top Layer w0.131: v1(152.654,127.762) 154.642,129.75 R53.1@154.642,132.639
  Layer 3 w0.124: v3(151.542,107.918) 151.542,108.87 151.892,109.22 151.892,110.998 154.813,113.919 154.813,118.237 151.257,121.793 151.257,126.365 v1(152.654,127.762)
LP_LANE1_P: 1.Y18 R47.1 | length 31.7
  Top Layer w0.05: 1.Y18@153.542,108.318 v3(153.942,108.718)
  Top Layer w0.131: v1(152.654,124.816) 153.187,125.349 155.067,125.349 156.21,126.492 156.21,128.27 157.32,129.38 R47.1@157.32,132.639
  Layer 3 w0.131: v1(152.654,124.816) 157.817,119.653 157.817,111.82 154.715,108.718 v3@153.935,108.718
MIPI_CLK_N: 1.P20 J1.8 R51.2 R54.2 | length 38
  Top Layer w0.131: 1.P20@148.742,109.918 148.482,110.177 148.482,110.647 154.559,116.724 154.559,117.84 161.19,124.471 161.19,125.846 160.417,126.619 160.1,126.619 159.966,126.753 v1(159.893,126.753) ; J1.8@158.471,139.266 158.471,138.741 158.705,138.506 158.753,138.506 158.83,138.429 158.83,136.452 158.753,136.375 158.705,136.375 158.471,136.141 J1.8@158.471,135.516 158.471,134.891 158.705,134.656 158.753,134.656 158.83,134.579 158.83,133.79 159.397,133.223 159.397,132.925 159.318,132.846 159.306,132.846 R54.2@159.098,132.639 159.093,132.633 159.093,131.755 R51.2@159.087,131.75 159.295,131.542 159.318,131.542 159.397,131.464 159.397,130.89 159.262,130.756 v1(159.262,130.683)
  Layer 3 w0.131: v1(159.262,130.683) 159.262,130.61 159.397,130.476 159.397,130.17 159.397,129.639 160.782,128.254 160.782,127.127 160.274,126.619 160.027,126.619 v1(159.893,126.753)
MIPI_CLK_P: 1.N20 J1.9 R48.2 R51.1 | length 38
  Top Layer w0.131: 1.N20@147.942,109.918 148.201,110.177 148.201,110.763 154.278,116.84 154.278,117.956 160.909,124.587 160.909,125.73 160.301,126.338 160.1,126.338 159.966,126.203 v1(159.893,126.203) ; J1.9@159.471,139.266 159.471,138.741 159.236,138.506 159.188,138.506 159.111,138.429 159.111,136.452 159.188,136.375 159.236,136.375 159.471,136.141 J1.9@159.471,135.516 159.471,134.891 159.236,134.656 159.188,134.656 159.111,134.579 159.111,133.906 159.678,133.339 159.678,132.925 159.757,132.846 159.769,132.846 R48.2@159.976,132.639 159.982,132.633 159.982,131.755 R51.1@159.987,131.75 159.78,131.542 159.757,131.542 159.678,131.464 159.678,130.89 159.812,130.756 v1(159.812,130.683)
  Layer 3 w0.131: v1(159.812,130.683) 159.812,130.61 159.678,130.476 159.678,130.286 159.678,129.755 161.063,128.37 161.063,127.011 160.39,126.338 160.028,126.338 v1(159.893,126.203)
MIPI_LANE0_N: 1.Y17 J1.2 R49.2 R52.2 | length 37.5
  Top Layer w0.05: 1.Y17@153.542,107.518 v3(153.942,107.918)
  Top Layer w0.131: R49.2@151.975,131.75 152.183,131.542 152.206,131.542 152.285,131.464 152.285,130.98 152.283,130.979 152.283,130.69 152.106,130.513 v1(152.106,130.478) ; R52.2@151.986,132.639 152.194,132.846 152.206,132.846 152.285,132.925 152.285,133.663 152.83,134.208 152.83,134.579 152.753,134.656 152.705,134.656 152.471,134.891 J1.2@152.471,135.516 152.471,136.141 152.705,136.375 152.753,136.375 152.83,136.452 152.83,138.429 152.753,138.506 152.705,138.506 152.471,138.741 J1.2@152.471,139.266
  Layer 3 w0.131: v1(152.106,130.478) 152.106,130.444 152.283,130.267 152.283,128.956 153.389,127.85 153.389,125.131 158.672,119.848 158.672,111.544 155.047,107.918 v3@153.935,107.918
MIPI_LANE0_P: 1.Y16 J1.3 R46.2 R49.1 | length 38.6
  Top Layer w0.05: 1.Y16@153.542,106.718 v3(153.942,107.118)
  Top Layer w0.131: v1(152.741,130.478) 152.741,130.513 152.564,130.69 152.564,130.862 152.566,130.864 152.566,131.464 152.645,131.542 152.668,131.542 R49.1@152.875,131.75 ; R46.2@152.864,132.639 152.657,132.846 152.645,132.846 152.566,132.925 152.566,133.547 153.111,134.092 153.111,134.579 153.188,134.656 153.236,134.656 153.471,134.891 J1.3@153.471,135.516 153.471,136.141 153.236,136.375 153.188,136.375 153.111,136.452 153.111,138.429 153.188,138.506 153.236,138.506 153.471,138.741 J1.3@153.471,139.266
  Layer 3 w0.131: v1(152.741,130.478) 152.741,130.444 152.564,130.267 152.564,129.072 153.67,127.967 153.67,125.247 158.953,119.964 158.953,110.693 155.378,107.118 v3@153.935,107.118
MIPI_LANE1_N: 1.U15 J1.5 R50.2 R53.2 | length 42.9
  Top Layer w0.05: 1.U15@151.142,105.918 v3(151.542,106.318)
  Top Layer w0.131: J1.5@155.471,139.266 155.471,138.741 155.705,138.506 155.753,138.506 155.83,138.429 155.83,136.452 155.753,136.375 155.705,136.375 155.471,136.141 J1.5@155.471,135.516 155.471,134.891 155.705,134.656 155.753,134.656 155.83,134.579 155.83,134.071 155.841,134.06 155.841,132.925 155.762,132.846 155.75,132.846 R53.2@155.542,132.639 ; R50.2@155.531,131.75 155.739,131.542 155.762,131.542 155.841,131.464 155.841,130.426 155.843,130.423 155.843,130.157 155.666,129.98 v1(155.666,129.945)
  Layer 3 w0.131: v3(151.542,106.318) 151.593,106.267 151.924,106.267 152.019,106.172 152.68,106.172 152.761,106.253 152.761,106.383 153.011,106.634 153.273,106.634 153.458,106.449 153.458,106.249 153.534,106.172 153.643,106.172 153.672,106.201 155.477,106.201 159.766,110.49 159.766,119.999 154.405,125.36 154.405,128.116 155.843,129.554 155.843,129.734 155.666,129.911 v1(155.666,129.945)
MIPI_LANE1_P: 1.U14 J1.6 R47.2 R50.1 | length 42.9
  Top Layer w0.05: 1.U14@151.142,105.118 v3(151.542,105.518)
  Top Layer w0.131: v1(156.301,129.945) 156.301,129.98 156.124,130.157 156.124,130.54 156.122,130.542 156.122,131.464 156.201,131.542 156.224,131.542 R50.1@156.431,131.75 ; R47.2@156.42,132.639 156.213,132.846 156.201,132.846 156.122,132.925 156.122,134.176 156.111,134.187 156.111,134.579 156.188,134.656 156.236,134.656 156.471,134.891 J1.6@156.471,135.516 156.471,136.141 156.236,136.375 156.188,136.375 156.111,136.452 156.111,138.429 156.188,138.506 156.236,138.506 156.471,138.741 J1.6@156.471,139.266
  Layer 3 w0.131: v3(151.542,105.518) 151.915,105.891 152.797,105.891 152.906,106 153.23,106 153.338,105.891 153.759,105.891 153.789,105.92 155.594,105.92 160.047,110.374 160.047,120.115 154.686,125.476 154.686,128 156.124,129.438 156.124,129.734 156.301,129.911 v1(156.301,129.945)
Net1_A5: 1.A5 R218.2 | length 4.6
  Top Layer w0.1: R218.2@134.308,96.647 135.128,96.647 136.399,97.918 1.A5@138.342,97.918
Net1_A17: 1.A17 R214.2 | length 6.1
  Top Layer w0.05: v2(137.942,107.918) 1.A17@138.342,107.518
  Bottom Layer w0.1: R214.2@132.784,108.839 135.636,108.839 136.564,107.911 v2@137.942,107.911
Net1_A19: 1.A19 R207.2 | length 6.2
  Top Layer w0.05: v2(137.942,109.518) 1.A19@138.342,109.118
  Bottom Layer w0.1: R207.2@132.784,110.617 135.636,110.617 136.742,109.511 v2@137.942,109.511
Net1_B18: 1.B18 R210.2 | length 6.9
  Top Layer w0.05: v2(138.742,108.718) 1.B18@139.142,108.318
  Bottom Layer w0.1: R210.2@132.784,109.728 135.636,109.728 136.653,108.711 v2@138.742,108.711
Net1_D10: 1.D10 R212.2 | length 9.7
  Top Layer w0.05: v2(140.342,102.318) 1.D10@140.742,101.918
  Bottom Layer w0.1: R212.2@132.784,106.172 134.112,106.172 137.566,102.718 139.935,102.718 v2@140.342,102.311
Net1_D14: 1.D14 R234.2 | length 8.9
  Top Layer w0.05: v5(140.342,105.518) 1.D14@140.742,105.118
  Layer 6 w0.1: v5@140.342,105.511 140.342,105.887 139.935,106.294 139.935,111.233 140.589,111.887 v1(140.589,112.649)
  Bottom Layer w0.1: v1(140.589,112.649) 140.589,113.353 R234.2@140.647,113.411
Net1_E14: 1.E14 R208.2 | length 9.9
  Top Layer w0.05: v2(141.142,105.518) 1.E14@141.542,105.118
  Bottom Layer w0.1: R208.2@132.784,107.95 135.509,107.95 137.541,105.918 140.773,105.918 v2@141.131,105.56
Net1_F11: 1.F11 P14.2 R267.1 | length 55.7
  Top Layer w0.05: v4(141.942,102.318) 1.F11@142.342,102.718
  Layer 4 w0.1: v1(123.23,98.211) 126.003,100.984 137.941,100.984 138.168,101.211 139.565,101.211 139.572,101.218 139.673,101.218 139.925,101.47 139.925,101.66 140.176,101.911 140.265,101.911 140.365,102.011 141.642,102.011 v4@141.949,102.318
  Bottom Layer w0.1: R267.1@103.632,84.143 103.574,84.201 P14.2@101.981,84.201 101.981,85.217 100.838,86.36 100.838,89.408 101.473,90.043 105.918,90.043 106.172,89.789 116.586,89.789 123.23,96.433 v1(123.23,98.211)
Net1_F14: 1.F14 R216.2 | length 10.7
  Top Layer w0.05: v2(141.942,105.518) 1.F14@142.342,105.118
  Bottom Layer w0.1: R216.2@132.784,107.061 135.509,107.061 137.359,105.211 139.905,105.211 140.005,105.111 140.601,105.111 140.607,105.118 141.549,105.118 v2@141.942,105.511
Net1_G5: 1.G5 R248.1 | length 9.1
  Top Layer w0.05: v3(142.742,97.518) 1.G5@143.142,97.918
  Layer 3 w0.1: v1(135.001,97.79) 135.029,97.818 142.449,97.818 v3@142.749,97.518
  Bottom Layer w0.1: R248.1@134.308,97.79 v1(135.001,97.79)
Net1_H5: 1.H5 R247.1 | length 10
  Top Layer w0.05: v3(143.542,98.318) 1.H5@143.942,97.918
  Layer 3 w0.1: v1(135.001,98.806) 143.047,98.806 v3@143.542,98.311
  Bottom Layer w0.1: R247.1@134.308,98.806 v1(135.001,98.806)
NetC2_2: C2.2 C3.2 IC1.29 R89.2 | length 1.2
  Top Layer w0.1: IC1.29@100.282,113.985 100.282,113.51 v1(100.762,113.03)
NetC11_2: C11.2 IC1.27 R102.2 R104.2 | length 6.9
  Top Layer w0.1: v13(100.294,110.949) 100.584,110.659 R102.2@100.584,109.289
  Top Layer w0.13: IC1.27@99.482,113.985 99.482,111.761 v13(100.294,110.949) ; R102.2@100.457,109.111 R102.2@100.457,109.162
  Bottom Layer w0.1: v13(100.294,110.949) 100.203,110.858 R104.2@100.203,110.178 100.228,110.203 C11.2@101.092,110.203
NetC12_2: C12.2 IC1.36 Y1.1 | length 15.9
  Top Layer w0.1: IC1.36@101.432,116.735 103.349,116.735 104.064,117.45 110.236,117.45 110.498,117.711 C12.2@110.498,118.262 110.498,121.851 111.15,122.504 Y1.1@112.472,122.504
NetC13_2: C13.2 IC1.37 Y1.3 | length 9
  Top Layer w0.1: IC1.37@101.432,117.135 103.089,117.135 103.784,117.831 107.255,117.831 107.348,117.924 C13.2@107.348,118.288 107.348,119.188 106.572,119.964 Y1.3@106.172,119.964
NetC27_2: C27.2 C28.2 R119.1 U15.5 | length 1.8
  Top Layer w0.1: U15.5@136.939,121.286 136.954,121.271 136.954,120.796 v1(137.201,120.548) 137.24,120.548 137.803,119.985 C27.2@137.803,119.913
NetC29_2: C29.2 C30.2 FB3.1 U15.12 | length 1.8
  Top Layer w0.1: U15.12@138.75,124.096 139.766,124.096 C30.2@139.774,124.104 139.774,124.183 140.065,124.473 140.065,124.682 v1(140.122,124.739)
NetC31_1: C31.1 U15.13 | length 4
  Top Layer w0.1: U15.13@138.75,124.596 139.074,124.596 141.392,126.915 141.392,127.279
NetC31_2: C31.2 C37.2 J3.2 R121.1
NetC32_2: C32.2 C33.2 R120.1 U15.3 | length 1.8
  Top Layer w0.1: C32.2@135.075,119.913 135.075,119.985 135.639,120.548 v1(135.677,120.548) 135.925,120.796 135.925,121.271 U15.3@135.939,121.286
NetC34_2: C34.2 C35.2 FB4.1 U15.18 | length 1.7
  Top Layer w0.1: U15.18@136.439,125.907 136.454,125.921 136.454,126.397 v1(136.701,126.644) 136.732,126.644 137.295,127.208 C35.2@137.295,127.279
NetC36_1: C36.1 U15.14 | length 2.8
  Top Layer w0.1: U15.14@138.75,125.096 138.75,127.89
NetC36_2: C36.2 C38.2 J3.3 R122.1
NetC39_1: C39.1 R124.1 R127.1
NetC39_2: C39.2 C40.2 J4.2 R125.1 R126.1
NetC41_1: C41.1 R134.1 U15.24 | length 3.2
  Top Layer w0.1: 131.301,125.061 132.266,124.096 U15.24@134.129,124.096
NetC41_2: C41.2 C47.2 R129.2 R136.1
NetC42_2: C42.2 C43.2 U15.20 | length 1.8
  Top Layer w0.1: C43.2@134.567,127.279 134.567,127.208 135.131,126.644 v1(135.177,126.644) 135.425,126.397 135.425,125.921 U15.20@135.439,125.907
NetC44_1: C44.1 R135.1 U15.23 | length 2.6
  Top Layer w0.1: 131.762,125.261 132.426,124.596 U15.23@134.129,124.596
NetC44_2: C44.2 C48.2 R131.2 R137.1
NetC45_2: C45.2 U15.2 Y2.1 | length 3.4
  Top Layer w0.1: Y2.1@132.672,120.255 132.678,120.261 C45.2@133.985,120.261 134.649,120.261 134.969,120.582 135.085,120.582 135.439,120.936 U15.2@135.439,121.286
NetC46_2: C46.2 R128.2 U15.1 Y2.3 | length 8.3
  Top Layer w0.1: R128.2@131.173,117.119 130.472,117.82 Y2.3@130.472,118.555 130.572,118.555 131.445,119.428 131.445,120.735 132.098,121.388 C46.2@132.098,121.463 132.149,121.412 133.452,121.412 133.578,121.286 U15.1@134.939,121.286
NetC49_2: C49.2 C50.2 FB6.2 U16.1
NetC57_2: C57.2 IC4.8 R149.1 | length 2.1
  Top Layer w0.1: IC4.8@191.583,100.498 192.693,100.498 C57.2@192.761,100.566 R149.1@192.761,99.713
NetC233_2: C233.2 P8.2 | length 4.3
  Top Layer w0.1: C233.2@90.599,80.645 90.599,78.323 P8.2@91.991,76.932
NetD2_2: D2.2 R91.2 | length 1.2
  Top Layer w0.1: D2.2@186.639,83.82 186.722,83.903 R91.2@187.782,83.903
NetD6_1: D6.1 Q1.3 | length 1.4
  Top Layer w0.1: D6.1@167.571,82.951 167.796,82.726 168.098,82.726 168.649,82.175 Q1.3@168.649,82.15
NetD6_2: D6.2 R71.2 | length 1.1
  Top Layer w0.1: R71.2@163.705,82.912 164.742,82.912 D6.2@164.781,82.951
NetD6_3: D6.3 Q3.3 | length 1.1
  Top Layer w0.1: D6.3@167.571,83.801 Q3.3@168.649,83.801
NetD6_4: D6.4 R73.2 | length 1.1
  Top Layer w0.1: R73.2@163.705,83.801 D6.4@164.781,83.801
NetD6_5: D6.5 Q5.3 | length 1.4
  Top Layer w0.1: D6.5@167.571,84.651 167.796,84.876 168.098,84.876 168.649,85.427 Q5.3@168.649,85.452
NetD6_6: D6.6 R77.2 | length 1.1
  Top Layer w0.1: R77.2@163.705,84.69 164.742,84.69 D6.6@164.781,84.651
NetD7_1: D7.1 Q2.3 | length 1.6
  Top Layer w0.1: D7.1@154.236,82.951 154.406,82.951 155.145,82.212 155.267,82.212 155.441,82.039 Q2.3@155.441,82.023
NetD7_2: D7.2 R72.2 | length 1.1
  Top Layer w0.1: R72.2@150.37,82.912 151.407,82.912 D7.2@151.446,82.951
NetD7_3: D7.3 Q4.3 | length 1.2
  Top Layer w0.1: D7.3@154.236,83.801 Q4.3@155.441,83.801
NetD7_4: D7.4 R75.2 | length 1.1
  Top Layer w0.1: R75.2@150.37,83.801 D7.4@151.446,83.801
NetD7_5: D7.5 Q6.3 | length 1.6
  Top Layer w0.1: D7.5@154.236,84.651 154.406,84.651 155.145,85.39 155.267,85.39 155.441,85.563 Q6.3@155.441,85.579
NetD7_6: D7.6 R78.2 | length 1.1
  Top Layer w0.1: R78.2@150.37,84.69 151.407,84.69 D7.6@151.446,84.651
NetD12_2: D12.2 R166.2
NetDS1_1: DS1.1 R43.1 | length 1.6
  Top Layer w0.1: DS1.1@131.31,92.708 R43.1@131.31,94.302
NetDS2_1: DS2.1 R58.1
NetDS3_1: DS3.1 R61.1
NetDS4_1: DS4.1 R62.1
NetDS5_1: DS5.1 R65.1
NetDS9_2: DS9.2 R171.2
NetDS10_1: DS10.1 R205.1 | length 1.1
  Top Layer w0.1: R205.1@163.518,105.791 DS10.1@164.604,105.791
NetDS11_2: DS11.2 R294.1 | length 1.6
  Bottom Layer w0.1: DS11.2@152.552,166.764 153.244,166.072 R294.1@153.822,166.072
NetIC1_22: IC1.22 R97.1 R100.2 | length 6.6
  Top Layer w0.13: R100.2@95.504,109.289 95.504,110.893 v13(95.872,111.26) 97.482,112.871 IC1.22@97.482,113.985
  Bottom Layer w0.1: R97.1@95.758,110.178 95.758,111.147 v13(95.872,111.26)
NetIC1_23: IC1.23 R96.1 R99.2 R105.2 | length 7
  Top Layer w0.13: R99.2@96.52,109.289 96.52,110.873 96.692,111.044 v8(96.692,111.084) 97.882,112.275 IC1.23@97.882,113.985
  Bottom Layer w0.1: R96.1@96.647,110.178 96.647,111.04 v8(96.692,111.084) 96.832,111.225 R105.2@96.832,111.887
NetIC1_24: IC1.24 R95.1 R98.2 | length 5.8
  Top Layer w0.13: R98.2@97.536,109.289 97.536,110.877 v13(97.501,110.912) 98.282,111.693 IC1.24@98.282,113.985
  Bottom Layer w0.1: v13(97.501,110.912) 97.536,110.877 R95.1@97.536,110.178
NetIC1_25: IC1.25 R93.2 R94.1 | length 5.5
  Top Layer w0.13: R93.2@98.552,109.289 98.552,110.533 98.349,110.736 v13(98.349,110.744) 98.682,111.077 IC1.25@98.682,113.985
  Bottom Layer w0.1: v13(98.349,110.744) 98.425,110.668 R94.1@98.425,110.178
NetIC1_26: IC1.26 R101.2 R103.2 | length 5.5
  Top Layer w0.1: v13(99.365,110.744) 99.365,110.663 99.568,110.46 R101.2@99.568,109.289
  Top Layer w0.13: IC1.26@99.082,113.985 99.082,111.027 v13(99.365,110.744)
  Bottom Layer w0.1: R103.2@99.314,110.178 99.314,110.693 v13(99.365,110.744)
NetIC1_32: IC1.32 R106.2 R109.1 | length 6.4
  Top Layer w0.1: IC1.32@101.432,115.135 101.908,115.135 102.87,114.173 102.87,113.055 104.089,111.836 R109.1@104.909,111.836 R106.2@104.909,110.947
NetIC1_33: IC1.33 R110.1 R112.1 | length 5.2
  Top Layer w0.1: IC1.33@101.432,115.535 102.168,115.535 104.089,113.614 R112.1@104.909,113.614 R110.1@104.909,112.725
NetIC1_34: IC1.34 R107.2 R111.1 | length 4.6
  Top Layer w0.1: IC1.34@101.432,115.935 102.378,115.935 102.921,115.392 R111.1@104.909,115.392 R107.2@104.909,114.503
NetIC1_35: IC1.35 R114.1 | length 3.5
  Top Layer w0.1: IC1.35@101.432,116.335 103.781,116.335 103.835,116.281 R114.1@104.909,116.281
NetIC1_39: IC1.39 R113.1
NetIC2_16: IC2.16 SD1.8 | length 14.6
  Top Layer w0.1: IC2.16@171.053,133.223 v1(171.053,134.239)
  Bottom Layer w0.1: SD1.8@161.464,136.652 161.464,134.7 163.83,132.334 169.672,132.334 171.053,133.715 v1(171.053,134.239)
NetIC2_18: IC2.18 SD1.7 | length 11.9
  Top Layer w0.1: IC2.18@170.053,133.223 v1(170.053,134.239)
  Bottom Layer w0.1: SD1.7@162.564,136.652 162.564,134.87 164.465,132.969 169.291,132.969 170.053,133.731 v1(170.053,134.239)
NetIC2_19: IC2.19 SD1.5 | length 8
  Top Layer w0.1: v1(168.91,133.858) 169.353,133.415 IC2.19@169.353,132.523
  Bottom Layer w0.1: SD1.5@164.764,136.652 164.764,134.702 165.608,133.858 v1(168.91,133.858)
NetIC2_20: IC2.20 R115.2 SD1.3 | length 6.3
  Top Layer w0.1: v1(167.005,135.382) 167.005,133.165 R115.2@167.386,132.784 167.825,132.784 168.586,132.023 IC2.20@169.353,132.023
  Bottom Layer w0.1: SD1.3@166.964,136.652 167.005,136.611 v1(167.005,135.382)